# Altium PCB 0060631C.PcbDoc (part 5 of 7)
Units mil, origin at the board's own origin, x right, y up, seen from the top; angles counter-clockwise.
Board outline 5480 x 8249 mil, 6 copper layers (Top Layer, Mid-Layer 1, Mid-Layer 2, Internal Plane 1, Internal Plane 2, Bottom Layer); 514 components, 269 nets, 1375 pads, 1334 vias.
Unrouted connection lines stored in the file: 126.
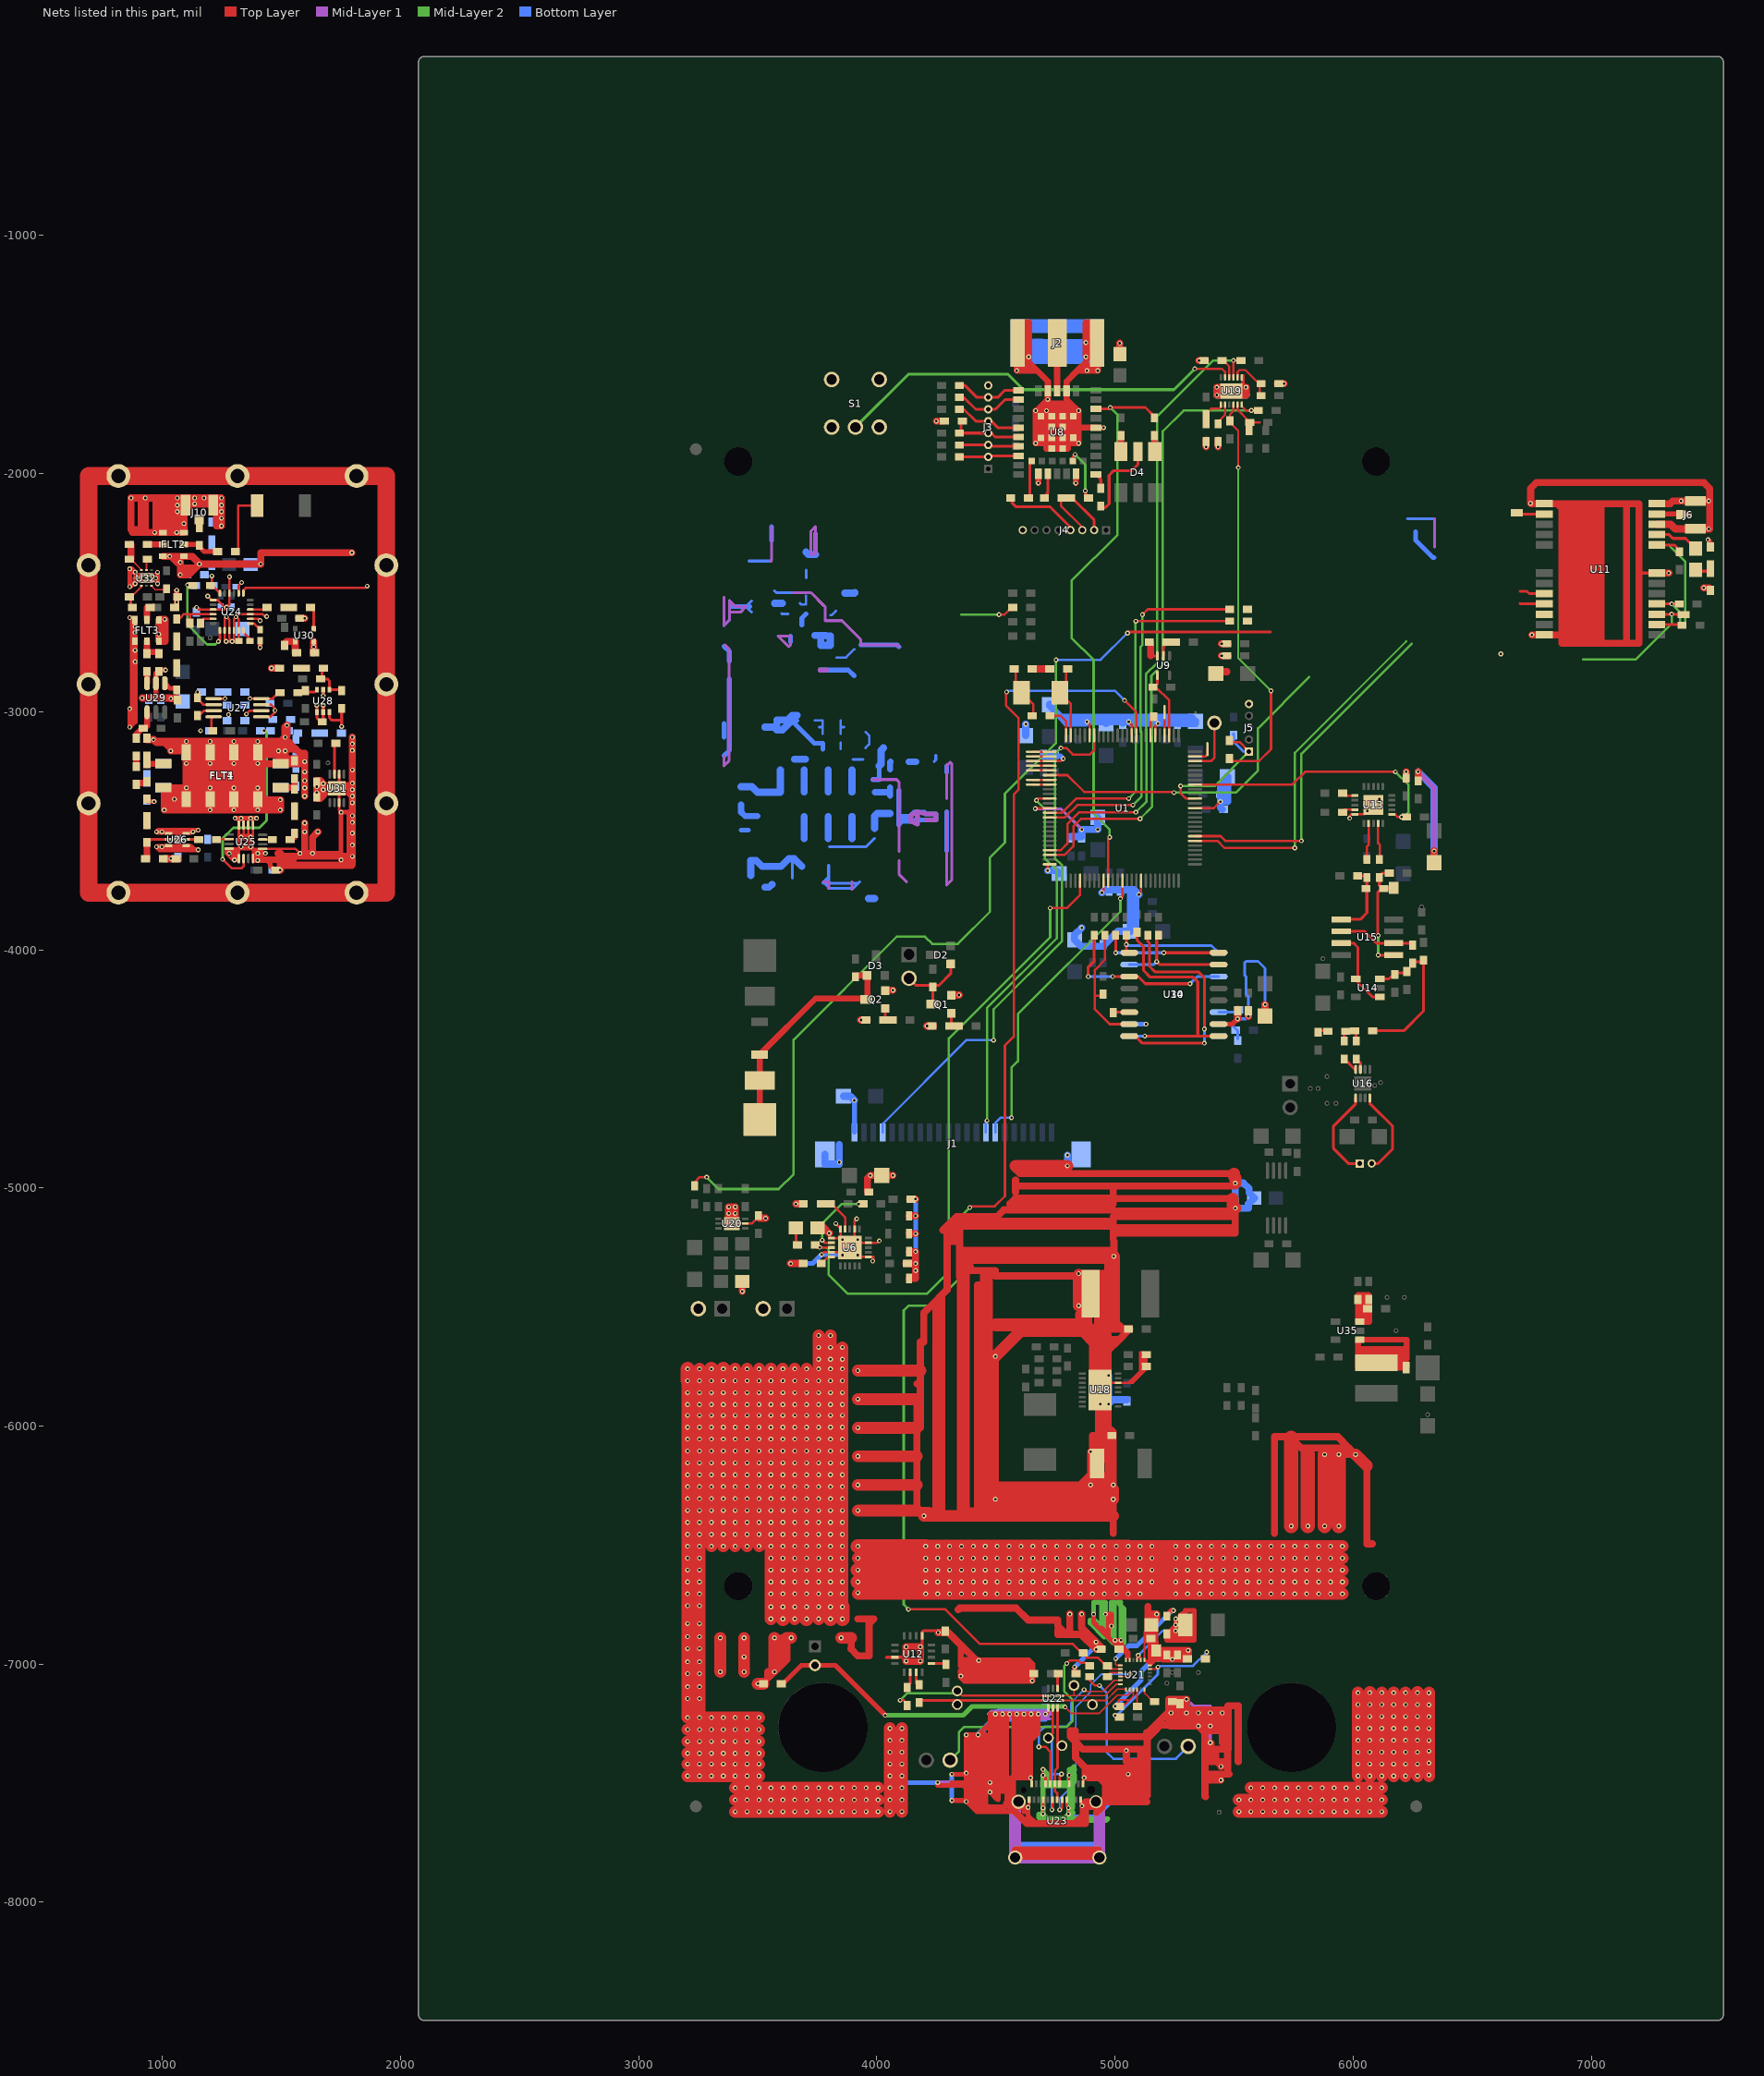
[diagram p9: the nets of this part, all layers, seen from the top]

## Via types
v1: diameter 20, hole 10, Top Layer to Bottom Layer, 1334 vias

## Nets (pads, with @x,y where several pads share a name; then routed paths per layer and width w, separated by ;. In a path a pad name is that pad's centre, name@x,y a point inside that pad or via, vN(x,y) a via of type N, cw(c..) or ccw(c..) an arc to the next point about the centre after c; other vN are vias at no path point) (continued)
GND: (continued)
  Bottom Layer w30: 3430,-3315 3475.5,-3315 3499,-3338.5 3594,-3338.5 3595,-3337.5 3595,-3245 ; 3470,-3687.5 3470,-3625 3487.5,-3625 3492.5,-3625 3517.5,-3650 3597.5,-3650 3630,-3617.5 3640,-3617.5 3645,-3617.5 3652.5,-3617.5 3685,-3650 ; 3530,-3065 3567.5,-3065 3580,-3077.5 ; 3570,-2545 3591.5,-2545 3602.5,-2545 ; 3655,-3200 3689,-3200 3700,-3200 ; 3695,-3532.5 3695,-3440 ; 3695,-3337.5 3695,-3245 ; 3702.5,-2330 3712.5,-2340 3737.5,-2340 3742.5,-2340 ; 3740,-2680 3762.5,-2680 3764,-2681.5 ; J1.23@3782.1,-4859.5 3782.1,-4900 3842.5,-4900 v1(3842.5,-4892.5) 3842.5,-4817.5 ; 3795,-3532.5 3795,-3440 ; 3795,-3337.5 3795,-3245 ; C31.2@3860,-4615 3887.5,-4615 v1(3905,-4632.5) v1@3906.1,-4633.6 ; 3865,-2502.5 3905,-2502.5 3907.5,-2500 ; 3895,-3532.5 3895,-3440 ; 3895,-3337.5 3895,-3245 ; 3965,-3785 3985,-3785 3990,-3785 ; 3990,-3490 3990,-3439.5 4002,-3427.5 4055,-3427.5 ; 4010,-3227.5 4017.5,-3220 4017.5,-3162.5 4027.5,-3152.5 ; C20.2@4625,-3100 v1(4625,-3052.5) ; C26.2@4700,-3185 C7.2@4750,-3185 ; v1(4717.5,-3667.5) 4752.5,-3667.5 C19.2@4765,-3680 ; C18.2@4725,-2970 4725,-2975 4773.8,-3023.8 ; v1(4800,-4907.5) v1(4800,-4862.5) ; C1.2@4815,-3525 4860,-3525 v1(4860,-3495) 4925,-3495 v1@4927.5,-3492.5 ; v1(4860,-3907.5) 4830,-3937.5 C124.2@4830,-3957.5 4857.5,-3985 4950,-3985 5012.5,-3922.5 C23.2@5065,-3922.5 ; v1(4927.5,-3495) v1@4927.5,-3492.5 ; C24.2@4927.5,-3445 v1@4927.5,-3492.5 ; v1(4937.4,-5907.5) v1(4972.4,-5907.5) ; v1(4945,-3760) 4957.5,-3747.5 5022.5,-3747.5 5065,-3747.5 ; C22.2@4962.5,-3050 C22.2@4962.5,-3042.5 ; v1(4972.4,-5787.5) v1(4972.4,-5907.5) ; C13.2@5032.5,-3047.5 C13.2@5032.5,-3042.5 ; R68.2@5049.9,-5890 4989.9,-5890 v1(4972.4,-5907.5) ; v1(5055,-7462.5) D7.2@5097.5,-7462.5 ; C17.2@5337.5,-3040 C17.2@5321.3,-3023.8 ; v1(5427.5,-1670) 5550,-1670 ; C16.2@5450,-3410 5442.5,-3402.5 v1(5442.5,-3377.5) ; C15.2@5450,-3347.5 5472.5,-3347.5 ; C21.2@5472.5,-3272.5 C21.2@5472.5,-3285 ; v1(6272.5,-3252.5) 6340,-3320 v1(6340,-3585) ; 3580,-3077.5 3580,-3035 3625,-3035 3645,-3015 3665,-3015 3642.5,-3037.5 3602.5,-3077.5 3580,-3077.5 ; 3764,-2681.5 3764,-2721.5 3799,-2721.5 3804,-2721.5 3804,-2681.5 3786.5,-2681.5 3785,-2680 3780,-2680 3765.5,-2680 3764,-2681.5 ; 4660,-1525 4660,-1505 J2.5@4925,-1505 ; 4660,-1525 4590,-1525 J2.4@4590,-1452.5 4590,-1367.5 4660,-1367.5 ; 4660,-1525 4925,-1525 J2.5@4925,-1505 ; 4660,-1367.5 4925,-1367.5 J2.5@4925,-1395 ; 4660,-1367.5 4660,-1395 J2.5@4925,-1395 ; 4773.8,-3023.8 C27.2@4845,-3023.8 ; 4773.8,-3023.8 4797.5,-3047.5 C27.2@4845,-3047.5 ; C27.2@4845,-3047.5 4877.5,-3047.5 v1(4882.5,-3042.5) C22.2@4962.5,-3042.5 ; C27.2@4845,-3047.5 C27.2@4845,-3041.5 C27.2@4845,-3023.8 ; C27.2@4845,-3023.8 5030,-3023.8 ; J2.5@4925,-1505 J2.5@4925,-1477.5 ; J2.5@4925,-1477.5 4660,-1477.5 4660,-1447.5 4692.5,-1447.5 4692.5,-1450 v1(4877.5,-1450) J2.5@4925,-1450 ; J2.5@4925,-1477.5 J2.5@4925,-1452.5 J2.5@4925,-1450 ; J2.5@4925,-1450 J2.5@4925,-1395 ; C22.2@4962.5,-3042.5 C13.2@5032.5,-3042.5 ; 5030,-3023.8 5032.5,-3023.8 ; 5030,-3023.8 5032.5,-3026.3 ; C13.2@5032.5,-3042.5 v1(5057.5,-3042.5) 5060,-3042.5 5065,-3047.5 C14.2@5087.5,-3047.5 ; C13.2@5032.5,-3042.5 5032.5,-3026.3 ; 5032.5,-3026.3 5032.5,-3023.8 ; 5032.5,-3023.8 C14.2@5087.5,-3023.8 ; C23.2@5065,-3922.5 5065,-3747.5 ; C23.2@5065,-3922.5 5087.5,-3900 5087.5,-3780 v1(5100,-3767.5) 5080,-3747.5 5065,-3747.5 ; C14.2@5087.5,-3047.5 5175,-3047.5 5180,-3042.5 5185,-3047.5 5262.5,-3047.5 5265,-3050 5337.5,-3050 C17.2@5321.3,-3033.8 ; C14.2@5087.5,-3047.5 C14.2@5087.5,-3041.5 C14.2@5087.5,-3026.3 ; C14.2@5087.5,-3026.3 C14.2@5090,-3023.8 ; C14.2@5087.5,-3026.3 C14.2@5087.5,-3023.8 ; C14.2@5087.5,-3023.8 C14.2@5090,-3023.8 ; C14.2@5090,-3023.8 C17.2@5311.3,-3023.8 ; C17.2@5311.3,-3023.8 C17.2@5321.3,-3033.8 ; C17.2@5311.3,-3023.8 C17.2@5321.3,-3023.8 ; C17.2@5321.3,-3033.8 C17.2@5321.3,-3023.8 ; v1(5442.5,-3377.5) 5472.5,-3347.5 ; v1(5442.5,-3377.5) 5442.5,-3315 C21.2@5472.5,-3285 ; v1(5442.5,-3377.5) 5472.5,-3377.5 5472.5,-3347.5 ; 5472.5,-3347.5 C21.2@5472.5,-3285 ; v1(5505,-5085) v1(5505,-4980) 5540,-4980 5562.5,-5002.5 5562.5,-5020 R58.2@5585,-5042.5 5560,-5067.5 5560,-5085 v1(5505,-5085)
  Bottom Layer w50: U23.S1@4594.9,-7578.2 4580.7,-7592.4 4580.7,-7770 ; 4580.7,-7770 4581.4,-7770.7 4934.3,-7770.7 U23.S3@4934.3,-7812.5 U23.S4@4580.7,-7812.5 4580.7,-7770
  other v1: 3920,-6700 1160,-3080 6620,-2757.5
GPS_OFF_1: R43.2 U1.6 U11.4 | length 1690
  Top Layer w10: U1.6@5335.6,-3542.5 5430,-3542.5 5460,-3572.5 v1(5755,-3572.5)
  Top Layer w12: U11.4@7275,-2547.6 7337.4,-2547.6 v1(7337.5,-2547.5) R43.2@7375,-2547.5
  Mid-Layer 2 w10: v1(5755,-3572.5) 5755,-3172.5 6222.5,-2705 ; v1(7337.5,-2547.5) 7372.5,-2582.5 7372.5,-2630
GPS_RST_1: R42.1 U1.7 U11.8 | length 1948
  Top Layer w10: U1.7@5335.6,-3522.8 5442.8,-3522.8 5462.5,-3542.5 v1(5782.5,-3542.5)
  Top Layer w12: U11.8@7275,-2299.7 7324.7,-2299.7 7347.2,-2299.7 R42.1@7370,-2322.5
  Mid-Layer 2 w10: v1(5782.5,-3542.5) 5782.5,-3177.5 6245,-2715 ; 7324.7,-2299.7 7395,-2370 7395,-2640
GPS_RX_1: R46.1 U1.64 | length 1503.5
  Top Layer w10: U1.64@4725.6,-3424.3 4777.5,-3424.3 4836.8,-3365 v1(5057.5,-3365) ; v1(5087.5,-2620) R46.1@5475,-2620
  Mid-Layer 2 w10: v1(5057.5,-3365) 5087.5,-3335 5087.5,-3092.5 5085,-3090 5085,-2622.5 v1(5087.5,-2620)
GPS_TX_1: R45.1 U1.65 | length 1558.7
  Top Layer w10: U1.65@4725.6,-3444 4790,-3444 4841.5,-3392.5 v1(5075,-3392.5) ; v1(5115,-2592.5) 5137.5,-2570 R45.1@5475,-2570
  Mid-Layer 2 w10: v1(5075,-3392.5) 5110,-3357.5 5110,-3085 5107.5,-3082.5 5107.5,-2727.5 5115,-2720 v1(5115,-2592.5)
GPSBACKUP_1: R92.2 U11.22 | length 4249.2
  Top Layer w10: R92.2@3235,-4997.5 3235,-4975 3255,-4955 v1(3285,-4955)
  Top Layer w12: v1(5052.5,-2670) 5056.6,-2665.9 5652.8,-2665.9
  Mid-Layer 2 w10: v1(3285,-4955) 3335,-5005 3587.5,-5005 3650,-4942.5 3650,-4377.5 4082.5,-3945 ; 4084.24,-3945 4202.5,-3945 4232.5,-3975 4340,-3975 4475,-3840 4475,-3612.5 4537.5,-3550 4537.5,-3345 4752.5,-3130 v1(4752.5,-2782.5)
  Bottom Layer w10: v1(4752.5,-2782.5) 4940,-2782.5 v1(5052.5,-2670)
INOKB_1: R88.2 R89.2 U1.35 U21.2 | length 5875.9
  Top Layer w7: R89.2@4962.5,-7007.5 4976,-7021 U21.2@5022.5,-7021
  Top Layer w10: v1(4132.5,-6770) 4287.5,-6770 4432.6,-6915.1 4822.6,-6915.1 4860,-6952.5 4880.1,-6972.6 4927.6,-6972.6 R89.2@4962.5,-7007.5 ; v1(4390,-5082.5) 4395,-5077.5 4495,-5077.5 4537.5,-5035 4537.5,-4402.5 4575,-4365 4575,-3347.5 4595,-3327.5 4595,-3027.5 4542.5,-2975 4542.5,-2920 v1(4545,-2917.5) ; v1(5040,-2952.5) 5089.7,-3002.2 U1.35@5089.7,-3099.6
  Mid-Layer 2 w10: v1(4132.5,-6770) 4112.5,-6750 4112.5,-5515 4132.5,-5495 4232.5,-5495 4347.5,-5380 4347.5,-5125 v1(4390,-5082.5)
  Bottom Layer w10: v1(4545,-2917.5) 4550,-2912.5 5000,-2912.5 v1(5040,-2952.5)
INT_1: R75.2 U1.73 U19.12 | length 2692.9
  Top Layer w9: U19.12@5532.5,-1710 5532.5,-1717.5 5550,-1735 v1(5572.5,-1735) ; v1(5572.5,-1735) 5607.5,-1735 v1(5572.5,-1735)
  Top Layer w10: U1.73@4725.6,-3601.6 4788.4,-3601.6 4825,-3565 4825,-3482.5 4857.5,-3450 v1(5105,-3450)
  Mid-Layer 2 w10: v1(5105,-3450) 5155,-3400 5155,-3067.5 5152.5,-3065 5152.5,-2850 5200,-2802.5 5200,-1822.5 5287.5,-1735 v1(5572.5,-1735)
INTA_1: R31.2 U1.18 U13.11 | length 1167.5
  Top Layer w10: U1.18@5335.6,-3306.1 5745,-3306.1 5798.6,-3252.5 v1(6177.5,-3252.5) ; U13.11@6162.3,-3431.3 6176.3,-3431.3 6187.5,-3442.5 v1(6202.5,-3442.5) R31.2@6230,-3442.5
  Mid-Layer 2 w10: v1(6177.5,-3252.5) 6232.5,-3307.5 6232.5,-3422.5 6212.5,-3442.5 v1(6202.5,-3442.5)
IRQT_1: R23.2 U1.79 U6.3 | length 2714
  Top Layer w10: R23.2@3735,-5240 3745,-5250 v1(3760,-5250) 3760.4,-5250.4 U6.3@3809,-5250.4 ; v1(4727.5,-3825) 4797.5,-3825 4853.3,-3769.2 U1.79@4853.3,-3709.6
  Mid-Layer 2 w10: v1@3760.4,-5250.4 v1(3760,-5250) 3787.5,-5250 3797.5,-5260 3797.5,-5365 3877.5,-5445 4210,-5445 4302.5,-5352.5 4302.5,-4372.5 4727.5,-3947.5 v1(4727.5,-3825)
KILL_1: R74.1 U1.72 U19.3 | length 2776.8
  Top Layer w9: U19.3@5497.1,-1596 5497.1,-1525.4 5522.1,-1525.4 R74.1@5522.5,-1525
  Top Layer w10: U1.72@4725.6,-3581.9 4772.5,-3581.9 4800,-3554.4 4800,-3472.5 4850,-3422.5 v1(5087.5,-3422.5)
  Mid-Layer 2 w9: v1@5497.1,-1525.4 v1(5497.5,-1525) ; v1(5497.5,-1525) 5412.5,-1525 v1(5497.5,-1525)
  Mid-Layer 2 w10: v1(5087.5,-3422.5) 5132.5,-3377.5 5132.5,-3075 5130,-3072.5 5130,-2842.5 5177.5,-2795 5177.5,-1760 5412.5,-1525
LCD_A0_1: J1.19 U1.44 | length 2238.1
  Top Layer w10: v1(4772.5,-3152.5) 4795,-3152.5 4822.5,-3180 4894.9,-3180 4912.4,-3162.5 U1.44@4912.4,-3099.6
  Mid-Layer 2 w10: v1(4490,-4380) 4490,-4250 4777.5,-3962.5 4777.5,-3645 4747.5,-3615 4747.5,-3177.5 v1(4772.5,-3152.5)
  Bottom Layer w10: J1.19@4024.3,-4767 4024.3,-4730.7 4375,-4380 v1(4490,-4380)
LCD_CS_1: J1.8 U1.61 | length 1611.5
  Top Layer w10: v1(4670,-3372.5) 4677.3,-3365.2 U1.61@4725.6,-3365.2
  Mid-Layer 2 w10: v1(4462.5,-4717.5) 4462.5,-4245 4755,-3952.5 4755,-3665 4705,-3615 4705,-3407.5 v1(4670,-3372.5)
  Bottom Layer w10: J1.8@4457.7,-4767 4457.7,-4722.3 v1(4462.5,-4717.5)
LCD_RST_1: J1.7 U1.88 | length 1304.7
  Top Layer w10: v1(5022.5,-3785) 5030.6,-3776.9 U1.88@5030.6,-3709.6
  Mid-Layer 2 w10: v1(4565,-4705) 4565,-4495 4592.5,-4467.5 4592.5,-4270 5022.5,-3840 v1(5022.5,-3785)
  Bottom Layer w10: J1.7@4497.1,-4767 4497.1,-4727.9 4520,-4705 v1(4565,-4705)
LE_3: R121.1 U24.19 | length 762.2
  Top Layer w10: U24.19@1339.9,-2502.5 1339.9,-2490.1 1350,-2480 1852.5,-2480 v1(1860,-2472.5) ; v1(4512.5,-2592.5) 4535,-2592.5 R121.1@4565,-2562.5
  Mid-Layer 2 w10: 4355,-2592.5 v1(4512.5,-2592.5)
MP_RST_1: R2.1 R81.2 U19.10 | length 1722.8
  Top Layer w9: U19.10@5497.1,-1710 5497.1,-1737.9 5482.5,-1752.5 5482.5,-1785 5517.5,-1820 v1(5517.5,-1975)
  Top Layer w10: R2.1@5480,-3202.5 5485,-3207.5 5605,-3207.5 5655,-3157.5 v1(5655,-2912.5)
  Mid-Layer 2 w9: v1(5517.5,-1975) 5517.5,-2775 v1(5655,-2912.5)
N00001: J6.1 L1.1 U11.11 | length 312.6
  Top Layer w20: U11.11@7275,-2169.8 J6.1@7374.8,-2169.8 ; J6.1@7377,-2172 J6.1@7374.8,-2169.8 ; v1(7412.5,-2170) 7412.3,-2169.8 J6.1@7374.8,-2169.8 ; v1(7490,-2277.5) 7500,-2287.5 L1.1@7500,-2302.5
  Bottom Layer w20: 6262.3,-2244.8 6262.5,-2245 6262.5,-2280 6335,-2352.5 6340,-2352.5
N00002: R33.2 R40.1 U10.7 | length 541
  Top Layer w10: R40.1@4950,-4192.5 4915,-4192.5 ; R33.2@4957.5,-3932.5 4957.5,-4042.5 4915,-4085 4915,-4192.5 ; U10.7@5060,-4312.5 4977.5,-4312.5 4915,-4250 4915,-4192.5
N00003: R25.2 R127.2 U6.19 | length 179
  Top Layer w10: R127.2@3760,-5067.5 3810,-5067.5 3866.7,-5124.2 U6.19@3866.7,-5173
N00007: R34.2 U10.16 U34.16 | length 512.5
  Top Layer w12: v1(5002.5,-4012.5) R34.2@5002.5,-3932.5 ; v1(5205,-4012.5) U10.16@5435,-4012.5
  Bottom Layer w12: v1(5002.5,-4012.5) U34.16@5060,-4012.5 v1(5205,-4012.5)
N00009: R35.2 U10.15 U34.15 | length 506
  Top Layer w12: R35.2@5182.5,-3932.5 5175,-3940 v1(5175,-4050) 5187.5,-4062.5 U10.15@5435,-4062.5
  Bottom Layer w12: U34.15@5060,-4062.5 5162.5,-4062.5 v1(5175,-4050)
N00010: TP11.1 U10.6 | length 69.6
  Top Layer w12: TP11.1@4992.5,-4257.5 4997.5,-4262.5 U10.6@5060,-4262.5
N00011: C39.1 L1.2 R41.2 | length 97.1
  Top Layer w12: R41.2@7437.5,-2405 7442.5,-2410 7500,-2410 L1.2@7500,-2377.5
N00013: R36.2 U10.8 U34.8 | length 1052.7
  Top Layer w12: U10.8@5060,-4362.5 5085,-4362.5 5115,-4392.5 v1(5375,-4392.5) ; R36.2@5137.5,-3932.5 5137.5,-3965 5145,-3972.5 5145,-4070 5167.5,-4092.5 5350,-4092.5 5375,-4117.5 v1(5375,-4332.5)
  Bottom Layer w12: v1(5375,-4392.5) 5375,-4362.5 ; v1(5375,-4332.5) 5375,-4362.5 ; U34.8@5435,-4362.5 5375,-4362.5
N00018: R1.2 U6.2 | length 325.1
  Top Layer w10: v1(3770,-5220) 3780.7,-5230.7 U6.2@3809,-5230.7 ; v1(3922.5,-5067.5) R1.2@3947.5,-5067.5
  Mid-Layer 2 w10: v1(3770,-5220) 3770,-5150 3852.5,-5067.5 v1(3922.5,-5067.5)
N00020: R37.2 U10.9 U34.9 | length 1016.1
  Top Layer w12: R37.2@5092.5,-3932.5 5092.5,-3960 5120,-3987.5 5120,-4087.5 5147.5,-4115 5327.5,-4115 5347.5,-4135 5347.5,-4362.5 ; v1(5125,-4362.5) 5347.5,-4362.5 ; U10.9@5435,-4362.5 5347.5,-4362.5
  Bottom Layer w12: U34.9@5060,-4362.5 v1(5125,-4362.5)
N00021: TP13.1 U11.14 | length 117.3
  Top Layer w12: TP13.1@6687.5,-2165 6692.3,-2169.8 U11.14@6802.8,-2169.8
N00023: R38.2 U10.1 U34.1 | length 487.2
  Top Layer w12: R38.2@5047.5,-3932.5 v1(5047.5,-3977.5) 5047.5,-4000 U10.1@5060,-4012.5
  Bottom Layer w12: v1(5047.5,-3977.5) 5052.5,-3982.5 5405,-3982.5 U34.1@5435,-4012.5
N00024: R41.1 U11.9 | length 186.8
  Top Layer w12: U11.9@7275,-2256.4 7326.4,-2256.4 7342.5,-2272.5 7395,-2272.5 R41.1@7437.5,-2315
N00025: D1.1 R23.1 | length 72.5
  Top Layer w12: R23.1@3660,-5240 D1.1@3660,-5167.5
N00027: R39.2 U10.3 U34.3 | length 762.7
  Top Layer w12: v1(4887.5,-4112.5) 4887.5,-4072.5 4912.5,-4047.5 R39.2@4912.5,-3932.5 ; v1(4990,-4112.5) U10.3@5060,-4112.5 5097.5,-4112.5 5127.5,-4142.5 v1(5315,-4142.5)
  Bottom Layer w12: v1(4887.5,-4112.5) v1(4990,-4112.5) ; v1(5315,-4142.5) 5345,-4112.5 U34.3@5435,-4112.5
N00028: R24.2 U6.5 | length 60.5
  Top Layer w10: R24.2@3760,-5317.5 3767.5,-5317.5 3795.2,-5289.8 U6.5@3809,-5289.8
N00031: R124.1 R125.2 U34.7 | length 126.4
  Bottom Layer w12: U34.7@5435,-4312.5 5487.5,-4312.5 5512.5,-4337.5 5515,-4340 R124.1@5515,-4375
N00036: R45.2 U11.20 | length 106.7
  Top Layer w12: 6700,-2495 6730,-2495 6739.3,-2504.3 U11.20@6802.8,-2504.3
N00038: R46.2 U11.21 | length 103.9
  Top Layer w12: 6700,-2545 6702.6,-2547.6 U11.21@6802.8,-2547.6
N00040: TP16.1 U34.6 | length 94.1
  Bottom Layer w12: U34.6@5435,-4262.5 5515,-4262.5 TP16.1@5525,-4252.5
N00041: TP12.1 U1.56 U11.3 | length 2015
  Top Layer w10: U1.56@4725.6,-3266.7 4800,-3266.7 4870.8,-3337.5 5245,-3337.5 v1(5247.5,-3340)
  Top Layer w12: U11.3@7275,-2590.9 v1@7336.6,-2590.9 ; v1(7337.5,-2590) v1@7336.6,-2590.9 ; TP12.1@7387.5,-2592.5 7385.9,-2590.9 v1@7336.6,-2590.9
  Mid-Layer 2 w10: v1(5247.5,-3340) 5507.5,-3340 5600,-3247.5 5600,-3070 5815,-2855 ; 6965,-2780 7187.5,-2780 7337.5,-2630 v1(7337.5,-2590) v1@7336.6,-2590.9
N00042: R44.1 U11.2 | length 101.4
  Top Layer w12: U11.2@7275,-2634.2 7371.7,-2634.2 R44.1@7375,-2637.5
N00043: BZ3.2 D2.1 Q1.3 R8.2 | length 316.7
  Top Layer w12: BZ3.2@4135,-4120 4165,-4150 R8.2@4235,-4150 ; Q1.3@4237.5,-4227.5 4235,-4225 R8.2@4235,-4150 ; D2.1@4310,-4070 4310,-4100 4260,-4150 R8.2@4235,-4150
N00045: Q1.1 R6.2 R7.1 | length 77.5
  Top Layer w12: Q1.1@4312.5,-4277.5 4312.5,-4320 R6.2@4347.5,-4320
N00047: D4.1 R12.2 | length 72.5
  Top Layer w26: D4.1@5025,-1907.5 R12.2@5025,-1835
N00048: R13.1 U8.1 | length 72
  Top Layer w12: U8.1@4919.5,-2004 4940,-2024.5 R13.1@4940,-2067.5
N00049: D4.3 R13.2 | length 355.3
  Top Layer w12: R13.2@4940,-2142.5 4960,-2142.5 4975,-2127.5 4975,-2007.5 4995,-1987.5 5070,-1987.5 5096,-1961.5 D4.3@5096,-1907.5
N00051: R14.1 U1.85 U8.8 | length 2411.5
  Top Layer w10: U1.85@4971.5,-3709.6 4971.5,-3533.5 v1(4977.5,-3527.5)
  Top Layer w12: U8.8@4919.5,-1728.5 4974,-1728.5 v1(4980,-1722.5) 5127.5,-1722.5 R14.1@5165,-1760
  Mid-Layer 2 w10: v1(4977.5,-3527.5) 4977.5,-3495 4910,-3427.5 4910,-2782.5 4817.5,-2690 4817.5,-2450 5010,-2257.5 5010,-1752.5 v1(4980,-1722.5)
N00052: D4.5 R14.2 | length 73.3
  Top Layer w26: R14.2@5165,-1835 5165,-1905.5 D4.5@5167,-1907.5
N00059: R9.1 U8.32 | length 239.3
  Top Layer w12: U8.32@4823,-1947 4823,-1929.5 v1(4832.5,-1920) ; v1(4875,-2072.5) 4875,-2082.5 R9.1@4895,-2102.5
  Mid-Layer 2 w12: v1(4832.5,-1920) 4875,-1962.5 v1(4875,-2072.5)
N00060: J4.2 R9.2 | length 173.3
  Top Layer w12: R9.2@4820,-2102.5 4912.5,-2195 J4.2@4912.5,-2237.5
N00061: R10.1 U8.27 | length 109.7
  Top Layer w12: R10.1@4697.5,-2102.5 4717.6,-2082.4 U8.27@4717.6,-2001.1
N00062: J4.3 R10.2 | length 172.3
  Top Layer w10: R10.2@4772.5,-2102.5 4772.5,-2135 4862.5,-2225 J4.3@4862.5,-2237.5
N00063: R11.1 U8.36 | length 158.5
  Top Layer w12: R11.1@4642.5,-2102.5 4642.5,-1954.3 U8.36@4649.8,-1947
N00064: J4.4 R11.2 | length 320
  Top Layer w12: R11.2@4567.5,-2102.5 4567.5,-2122.5 4585,-2140 4727.5,-2140 4812.5,-2225 J4.4@4812.5,-2237.5
N00067: BZ1.2 BZ2.2 BZ4.2 D3.1 Q2.3 R3.2 | length 968.9
  Top Layer w25: BZ4.2@3507.5,-4713 BZ1.2@3507.5,-4549.4 BZ2.2@3507.5,-4440.3 3742.8,-4205 Q2.3@3957.5,-4205 ; R3.2@3910,-4107.5 3947.5,-4107.5 3960,-4120 Q2.3@3960,-4205 ; Q2.3@3957.5,-4205 Q2.3@3960,-4205 ; Q2.3@3957.5,-4205 3960,-4207.5 Q2.3@3960,-4205
N00068: J3.2 R15.1 U8.23 | length 246.7
  Top Layer w12: R15.1@4352.5,-1930 J3.2@4467.5,-1930 4467.5,-1925.3 U8.23@4594.5,-1925.3
N00072: J3.3 R18.1 U8.22 | length 244.4
  Top Layer w12: R18.1@4352.5,-1880 J3.3@4467.5,-1880 4473.4,-1885.9 U8.22@4594.5,-1885.9
N00076: J3.4 R19.1 R27.1 U8.21 | length 298.9
  Top Layer w12: R27.1@4352.5,-1780 4352.5,-1830 J3.4@4467.5,-1830 4480,-1830 4496.6,-1846.6 U8.21@4594.5,-1846.6
N00080: Q2.1 R4.1 R5.2 | length 72.5
  Top Layer w12: Q2.1@4035,-4257.5 4035,-4295 R5.2@4070,-4295
N00081: J3.5 R28.1 U8.20 | length 274
  Top Layer w12: R28.1@4352.5,-1730 4365,-1730 4415,-1780 J3.5@4467.5,-1780 4480,-1780 4507.2,-1807.2 U8.20@4594.5,-1807.2
N00085: J3.6 R16.1 U8.17 | length 279.6
  Top Layer w12: R16.1@4352.5,-1680 4365,-1680 4415,-1730 J3.6@4467.5,-1730 4497.5,-1730 4538.3,-1689.2 U8.17@4594.5,-1689.2
N00087: J5.1 R2.2 R32.1 U1.15 | length 661.7
  Top Layer w10: v1(5275,-3312.5) 5275,-3342.5 5297.7,-3365.2 U1.15@5335.6,-3365.2 ; R2.2@5480,-3127.5 5522.5,-3127.5 J5.1@5562.5,-3167.5
  Mid-Layer 2 w10: v1(5275,-3312.5) 5417.5,-3312.5 J5.1@5562.5,-3167.5
  Bottom Layer w12: R32.1@5497.5,-3092.5 5497.5,-3125 5540,-3167.5 J5.1@5562.5,-3167.5
N00088: J3.7 R17.1 U8.16 | length 275.2
  Top Layer w12: R17.1@4352.5,-1630 4370,-1630 4420,-1680 J3.7@4467.5,-1680 4507.5,-1680 4537.7,-1649.8 U8.16@4594.5,-1649.8
N00091: TP8.1 U1.58 | length 70.1
  Top Layer w10: TP8.1@4655.5,-3306.1 U1.58@4725.6,-3306.1
N00092: TP7.1 U1.57 | length 70.1
  Top Layer w10: TP7.1@4655.5,-3286.4 U1.57@4725.6,-3286.4
N00093: TP1.1 U1.55 | length 70.1
  Top Layer w10: TP1.1@4655.5,-3247 U1.55@4725.6,-3247
N00094: TP2.1 U1.54 | length 70.1
  Top Layer w10: TP2.1@4655.5,-3227.3 U1.54@4725.6,-3227.3
N00095: TP9.1 U1.23 | length 233.2
  Top Layer w10: U1.23@5335.6,-3207.6 5402.4,-3207.6 5417.5,-3192.5 TP9.1@5417.5,-3047.5
N00096: J2.1 U8.13 | length 200.3
  Top Layer w26: U8.13@4757,-1652.6 4757,-1453 J2.1@4757.5,-1452.5
N00097: TP4.1 U1.24 | length 77.7
  Top Layer w10: U1.24@5335.6,-3187.9 5379.6,-3187.9 5387.5,-3180 TP4.1@5387.5,-3157.5
N00098: TP3.1 U1.52 | length 70.1
  Top Layer w10: TP3.1@4655.5,-3187.9 U1.52@4725.6,-3187.9
N00099: TP6.1 U1.51 | length 70.1
  Top Layer w10: TP6.1@4655.5,-3168.2 U1.51@4725.6,-3168.2
N00103: R22.2 U1.28 U9.4 | length 287.5
  Top Layer w10: R22.2@5165,-2897.5 R22.2@5172.5,-2897.5 ; R22.2@5168.8,-2893.7 R22.2@5172.5,-2897.5 ; U1.28@5227.6,-3099.6 5227.6,-2952.6 R22.2@5172.5,-2897.5
  Top Layer w12: R22.2@5168.8,-2893.7 5177.5,-2885 U9.4@5177.5,-2847.5
N00104: TP10.1 U1.29 | length 97.5
  Top Layer w10: U1.29@5207.9,-3099.6 TP10.1@5207.9,-3002.1
N00105: R123.2 U1.32 | length 90.3
  Top Layer w10: U1.32@5148.8,-3099.6 5148.8,-3028.7 R123.2@5162.5,-3015
N00106: C12.1 U1.49 Y1.2 | length 310.2
  Top Layer w10: C12.1@4795,-2820 4795,-2892.5 Y1.2@4767.5,-2920 4813.9,-2966.4 U1.49@4813.9,-3099.6
N00107: R26.1 U1.50 | length 131.1
  Top Layer w10: R26.1@4732.5,-3017.5 4772.5,-3017.5 4794.2,-3039.2 U1.50@4794.2,-3099.6
N00108: C11.1 R26.2 Y1.1 | length 228.6
  Top Layer w10: C11.1@4582.5,-2820 4582.5,-2895 Y1.1@4607.5,-2920 4657.5,-2970 R26.2@4657.5,-3017.5
N00109: R20.1 R21.2 U9.2 | length 103.9
  Top Layer w12: U9.2@5203.1,-2765.5 5203.1,-2729.4 R20.1@5223.7,-2708.8 ; R20.1@5225,-2707.5 R20.1@5223.7,-2708.8 ; R21.2@5260,-2707.5 5258.7,-2708.8 R20.1@5223.7,-2708.8
N00110: R108.2 U24.20 | length 80.1
  Top Layer w10: U24.20@1320.2,-2502.5 1320.2,-2469.8 v1(1332.5,-2457.5)
  Bottom Layer w10: 3804.7,-2595 3810,-2595 3827.5,-2577.5
N00111: C90.2 U24.14 | length 133.8
  Top Layer w10: U24.14@1368.8,-2610.1 1402.6,-2610.1 v1(1410,-2617.5)
  Bottom Layer w10: 3830,-2772.5 3870,-2772.5 3905,-2737.5
N00113: R101.2 R107.1 U30.1 | length 96.6
  Top Layer w30: R101.2@1512.5,-2715 1522.5,-2705 U30.1@1557.5,-2705 R107.1@1557.5,-2752.5
N00114: C100.1 R112.2 U24.7 | length 442.9
  Top Layer w10: v1(1235,-2705) 1241.4,-2698.6 U24.7@1241.4,-2658.7
  Top Layer w12: v1(1105,-2467.5) 1107.5,-2470 R112.2@1132.5,-2470
  Mid-Layer 2 w10: v1(1105,-2467.5) 1105,-2635 1187.5,-2717.5 1222.5,-2717.5 v1(1235,-2705)
  Bottom Layer w12: 3600,-2587.5 3602.5,-2590 3627.5,-2590
N00115: R110.1 U30.3 | length 92.4
  Top Layer w12: R110.1@1627.5,-2562.5 1634.5,-2569.5 U30.3@1634.5,-2652
N00116: C89.1 R110.2 | length 32.5
  Top Layer w12: C89.1@1520,-2562.5 R110.2@1552.5,-2562.5
N00117: C89.2 U24.16 | length 79.6
  Top Layer w10: U24.16@1368.8,-2570.7 1436.8,-2570.7 C89.2@1445,-2562.5
N00118: C98.1 C99.1 R112.1 U24.24 | length 151.9
  Top Layer w10: v1(1207.5,-2430) 1207.5,-2470 1208.9,-2470 U24.24@1241.4,-2502.5
  Bottom Layer w10: 3677.5,-2545 3682.5,-2550 3702.5,-2550 3702.5,-2512.5
N00120: R114.2 U31.7 | length 130.2
  Top Layer w12: U31.7@1722.5,-3262.7 R114.2@1722.5,-3132.5
N00121: C99.2 R113.1 | length 32.5
  Bottom Layer w12: 3702.5,-2437.5 3702.5,-2405
N00123: C91.1 L9.1 U24.4 | length 190.8
  Top Layer w10: C91.1@1060,-2605 1075.8,-2605 1090.4,-2590.4 1115.4,-2590.4 ; L9.1@1115,-2622.5 1115.4,-2622.1 1115.4,-2590.4 ; U24.4@1212.5,-2590.4 1115.4,-2590.4
N00124: C121.1 U24.12 | length 55.2
  Top Layer w10: U24.12@1339.9,-2658.7 1339.9,-2667.4 1367.5,-2695 C121.1@1367.5,-2702.5
N00125: R118.1 U24.13 | length 51.6
  Top Layer w10: U24.13@1368.8,-2629.8 1384.8,-2629.8 R118.1@1410,-2655
N00126: R111.1 U24.5 | length 57.6
  Top Layer w10: R111.1@1160,-2622.5 1172.4,-2610.1 U24.5@1212.5,-2610.1
N00128: C91.2 L12.1 | length 37.5
  Top Layer w12: L12.1@1060,-2717.5 C91.2@1060,-2680
N00129: C94.1 L12.2 | length 35
  Top Layer w12: C94.1@1060,-2827.5 L12.2@1060,-2792.5
N00130: R103.2 R109.1 U25.14 | length 867.1
  Top Layer w10: v1(1252.5,-3620) 1290,-3657.5 1332.5,-3657.5 1340.4,-3649.6 U25.14@1340.4,-3616.9
  Mid-Layer 2 w12: v1(1252.5,-3620) 1252.5,-3532.5 1297.5,-3487.5 1407.5,-3487.5 1437.5,-3457.5 1437.5,-3090 v1(1427.5,-3080)
  Bottom Layer w12: 3900,-3200 3922.5,-3200 3942.5,-3200
N00131: C103.2 L15.1 R106.2 | length 87.7
  Top Layer w30: L15.1@1010,-3617.5 v1(1035,-3617.5) R106.2@1062.5,-3617.5
  Bottom Layer w30: 3530,-3737.5 3547.5,-3737.5 3560,-3725
N00132: R115.2 U32.6 | length 74
  Top Layer w7: U32.6@954.1,-2472 969.6,-2487.5 1007.5,-2487.5 R115.2@1017.5,-2477.5
N00133: C94.2 U29.1 | length 59.1
  Top Layer w20: U29.1@1010,-2880.5 1032,-2902.5 C94.2@1060,-2902.5
N00134: L17.1 U32.2 | length 49.1
  Top Layer w7: U32.2@932.5,-2405 932.5,-2370 L17.1@942.5,-2360
N00135: C109.1 L18.2 U32.4 | length 109.9
  Top Layer w7: L18.2@867.5,-2517.5 870,-2517.5 910.9,-2476.6 U32.4@910.9,-2472
  Top Layer w12: C109.1@867.5,-2562.5 L18.2@867.5,-2517.5
N00136: ANT1.1 C106.1 | length 274.6
  Top Layer w10: C106.1@1312.5,-2327.5 1317.5,-2322.5 1317.5,-2135 ANT1.1@1397.5,-2135
N00137: C93.1 C106.2 FLT2.2 | length 159.9
  Top Layer w20: FLT2.2@1090,-2297.5 1145,-2297.5 1155,-2307.5 1175,-2327.5 C106.2@1237.5,-2327.5
N00138: C107.2 L17.2 U32.3 | length 125.5
  Top Layer w7: L17.2@867.5,-2360 910.9,-2403.4 U32.3@910.9,-2405
  Top Layer w30: L17.2@867.5,-2360 C107.2@867.5,-2297.5
N00139: C87.1 L15.2 U26.5 | length 160.2
  Top Layer w12: C87.1@935,-3555 953.5,-3536.5 U26.5@1025,-3536.5
  Top Layer w26: L15.2@935,-3617.5 C87.1@935,-3555
N00140: C107.1 FLT2.5 | length 59
  Top Layer w26: C107.1@942.5,-2297.5 FLT2.5@1001.5,-2297.5
N00141: C109.2 FLT3.2 | length 60
  Top Layer w26: FLT3.2@935,-2615 935,-2562.5 C109.2@942.5,-2562.5
N00142: C80.1 FLT3.5 L4.1 | length 96.5
  Top Layer w26: FLT3.5@935,-2703.5 935,-2750 L4.1@985,-2750
N00143: C80.2 U29.3 | length 55.5
  Top Layer w25: U29.3@935,-2880.5 C80.2@935,-2825
N00144: C95.2 L5.2 U29.4 | length 139.5
  Top Layer w25: C95.2@890,-3117.5 890,-3095 915,-3070 925,-3070 935,-3060 U29.4@935,-3002.5
N00145: C95.1 L11.1 | length 32.5
  Top Layer w26: L11.1@890,-3225 C95.1@890,-3192.5
N00146: L10.1 L11.2 | length 45
  Top Layer w26: L11.2@890,-3300 L10.1@935,-3300
N00147: C79.1 FLT1.11 L10.2 | length 101.5
  Top Layer w26: L10.2@935,-3225 L10.2@935,-3219 ; C79.1@935,-3192.5 L10.2@935,-3219 ; FLT1.11@1004,-3219 L10.2@935,-3219
N00148: C78.1 FLT1.5 L13.1 | length 92.9
  Top Layer w26: FLT1.5@1496,-3319 L13.1@1554,-3319 ; C78.1@1555,-3287.5 L13.1@1555,-3319 ; L13.1@1554,-3319 1555,-3320 L13.1@1555,-3319 ; L13.1@1554,-3319 L13.1@1555,-3319
N00149: L13.2 L14.1 | length 35
  Top Layer w26: L14.1@1555,-3430 L13.2@1555,-3395
N00150: C114.1 L14.2 | length 37.7
  Top Layer w26: C114.1@1542.5,-3537.5 1555,-3525 L14.2@1555,-3505
N00151: C114.2 U25.3 | length 47.1
  Top Layer w10: U25.3@1420.6,-3536.9 1466.9,-3536.9 C114.2@1467.5,-3537.5
N00152: C77.1 U25.10 | length 48.3
  Top Layer w10: C77.1@1232.5,-3537.5 1234.4,-3535.6 U25.10@1280,-3535.6
N00153: C77.2 U26.2 | length 57.9
  Top Layer w12: U26.2@1100,-3536.5 1156.5,-3536.5 C77.2@1157.5,-3537.5
N00154: C93.2 J10.1 | length 39.7
  Top Layer w26: J10.1@1154.5,-2193 1154.5,-2232 C93.2@1155,-2232.5
N00155: C87.2 L8.1 | length 32.5
  Top Layer w26: C87.2@935,-3480 L8.1@935,-3447.5
N00156: C86.1 R104.2 | length 35
  Top Layer w26: R104.2@1560,-2817.5 C86.1@1595,-2817.5
N00157: C86.2 L7.2 R105.1 U28.4 | length 171.7
  Top Layer w12: C86.2@1670,-2817.5 1670,-2862.5 1692.5,-2862.5 1701,-2871 U28.4@1701,-2907.5 1742.5,-2907.5 L7.2@1752.5,-2917.5
N00158: C83.1 R117.2 U27.5 U27.7 | length 224.9
  Top Layer w10: U27.5@1415,-3021.8 1453.2,-3021.8 1472.5,-3002.5 v1(1472.5,-2995) 1472.5,-2987.5 1455.6,-2970.6 U27.7@1415,-2970.6
  Bottom Layer w10: 3952.5,-3152.5 3967.5,-3137.5 3967.5,-3115 3967.5,-3100 3952.5,-3085
N00159: C115.2 L7.1 U28.3 | length 180.1
  Top Layer w12: U28.3@1701,-3001.7 1701,-3026 1710,-3035 1752.5,-3035 ; v1(1752.5,-3062.5) 1752.5,-3035 ; L7.1@1752.5,-2992.5 1752.5,-3035
  Bottom Layer w12: 4240,-3210 4247.5,-3202.5 4247.5,-3182.5
N00160: C85.2 L16.2 U28.6 | length 91.7
  Top Layer w12: C85.2@1562.5,-2920 1565,-2917.5 1600,-2917.5 1639,-2917.5 U28.6@1649,-2907.5
N00161: L8.2 L20.1 | length 62.1
  Top Layer w20: L8.2@935,-3372.5 940,-3377.5 v1(965,-3377.5)
  Bottom Layer w20: 3430,-3497.5 3460,-3497.5
N00162: C116.1 FLT4.11 L20.2 | length 108.1
  Bottom Layer w26: 3430,-3390 3430,-3422.5 3446,-3438.5 3499,-3438.5
N00163: C117.1 FLT4.5 L19.1 | length 100.4
  Bottom Layer w26: 3991,-3338.5 4054,-3338.5 ; 4055,-3352.5 4055,-3338.5 ; 4055,-3317.5 4055,-3337.5 ; 4054,-3338.5 4055,-3338.5 ; 4054,-3338.5 4055,-3337.5 ; 4055,-3338.5 4055,-3337.5
N00164: L19.2 L21.1 | length 33.5
  Bottom Layer w26: 4055,-3242.5 4055,-3212.5 4057.5,-3210
N00165: C115.1 L21.2 | length 32.5
  Bottom Layer w26: 4132.5,-3210 4165,-3210
N00166: C85.1 L6.1 R116.1 U27.8 | length 200.4
  Top Layer w10: v1(1367.5,-2945) U27.8@1415,-2945 1462.5,-2945 C85.1@1487.5,-2920
  Bottom Layer w10: 3847.5,-3092.5 3847.5,-3065 ; 3847.5,-3037.5 3847.5,-3065 ; 3862.5,-3065 3847.5,-3065
N00167: C82.1 U27.6 | length 95.7
  Top Layer w10: v1(1352.5,-3010) 1366.3,-2996.2 U27.6@1415,-2996.2
  Bottom Layer w10: 3847.5,-3157.5 3847.5,-3130
N00168: C119.1 L6.2 R116.2 U27.1 | length 150
  Top Layer w10: U27.1@1215,-2945 v1(1262.5,-2945)
  Bottom Layer w10: 3740,-3037.5 3772.5,-3037.5 3772.5,-3065 ; 3757.5,-3065 3772.5,-3065 ; 3772.5,-3092.5 3772.5,-3065
N00169: C118.1 U27.3 | length 78.4
  Top Layer w10: C118.1@1147.5,-3022.5 1173.8,-2996.2 U27.3@1215,-2996.2
N00170: R102.1 U27.4 | length 62.3
  Top Layer w10: R102.1@1205,-3080 1205,-3031.8 U27.4@1215,-3021.8
N00171: C72.1 R100.1 U21.23 U21.24 U23.A4 U23.A9 U23.B4 U23.B9 ~FV1.FV | length 4839.4
  Top Layer w7: C72.1@5018.8,-6939 C72.1@5020,-6937.7 ; C72.1@5027.5,-6935.2 5027.5,-6937.7 C72.1@5022.5,-6937.7 ; U21.24@5045.1,-6982.6 5045.1,-6972.7 ; U21.23@5060.9,-6982.6 5060.9,-6972.7 ; C72.1@5020,-6937.7 5017.5,-6937.7 5020,-6935.2 C72.1@5025,-6930.2 ; C72.1@5020,-6937.7 5032.5,-6950.2 5035,-6950.2 5045.1,-6960.3 ; C72.1@5020,-6937.7 C72.1@5022.5,-6937.7 ; C72.1@5022.5,-6937.7 5023.8,-6939 C72.1@5028.8,-6939 ; C72.1@5025,-6930.2 5035,-6930.2 5043.8,-6939 ; C72.1@5025,-6930.2 5030,-6925.2 5032.5,-6925.2 5037.5,-6925.2 5060.9,-6948.6 5060.9,-6972.7 ; C72.1@5028.8,-6939 5036.3,-6939 ; C72.1@5028.8,-6939 5045.1,-6955.3 ; 5036.3,-6939 5043.8,-6939 ; 5036.3,-6939 5050,-6952.7 5050,-6972.7 ; 5043.8,-6939 5055,-6950.2 5055,-6972.7 ; 5045.1,-6972.7 5050,-6972.7 ; 5045.1,-6972.7 5045.1,-6955.3 ; 5045.1,-6972.7 5045.1,-6960.3 ; 5045.1,-6960.3 5045.1,-6955.3 ; 5050,-6972.7 5055,-6972.7 ; 5055,-6972.7 5060.9,-6972.7
  Top Layer w10: v1(4697.5,-7629.5) v1(4697.5,-7604.5) ; v1(4697.5,-7442) v1(4697.5,-7467) ; U23.B9@4698.4,-7569.9 v1@4698.4,-7603.6 ; U23.A4@4708.3,-7503 4708.3,-7477.8 ; U23.B4@4796.9,-7569.9 4796.9,-7596.4 ; v1(4805,-7629.5) v1(4805,-7604.5) ; U23.A9@4806.8,-7503 v1@4806.8,-7467.7 ; v1(4697.5,-7604.5) v1@4698.4,-7603.6 ; v1(4697.5,-7604.5) v1@4698.4,-7603.6 ; v1(4697.5,-7467) 4708.3,-7477.8 ; v1(4697.5,-7467) 4708.3,-7477.8 ; 4796.9,-7596.4 v1(4805,-7604.5) ; 4796.9,-7596.4 v1(4805,-7604.5) ; v1@4806.8,-7467.7 v1(4807.5,-7467) v1@4806.8,-7467.7
  Top Layer w20: v1(4910,-6790.2) 4910,-6825.2 4937.5,-6852.7 ; v1(4960,-6790.2) 4972.5,-6790.2 ; v1(4985,-6840.2) 4985,-6790.2 4972.5,-6790.2 ; C72.1@5018.8,-6939 5017.5,-6937.7 5012.5,-6932.7 C72.1@5012.5,-6927.7 ; C72.1@5022.5,-6937.7 5020,-6935.2 C72.1@5012.5,-6927.7 ; C72.1@5032.5,-6925.2 5025,-6917.7 v1(5025,-6900.2) 5012.5,-6900.2 ; 4937.5,-6852.7 4942.5,-6847.7 4960,-6865.2 4960,-6875.2 ; 4937.5,-6852.7 4960,-6875.2 ; 4960,-6875.2 4972.5,-6887.7 ; 4972.5,-6887.7 4972.5,-6790.2 ; 4972.5,-6887.7 5000,-6915.2 ; 5000,-6915.2 v1(5000,-6900.2) 5012.5,-6900.2 ; 5000,-6915.2 C72.1@5012.5,-6927.7 ; C72.1@5012.5,-6927.7 5012.5,-6900.2
  Mid-Layer 2 w12: 4712.5,-7644.5 4790,-7644.5
  Mid-Layer 2 w20: v1@4692.5,-7627 4690,-7629.5 4680,-7629.5 4680,-7644.5 4685.5,-7650 4697.2,-7650 ; v1@4698.4,-7603.6 v1(4697.5,-7604.5) ; v1@4700,-7444.5 4720,-7464.5 4720,-7489.5 ; 4790,-7644.5 v1(4805,-7629.5) v1(4805,-7604.5) ; 5025,-6740.2 5010,-6740.2 5025,-6755.2 ; 4697.2,-7650 4692.5,-7657 4963,-7657 4970,-7650 4799.5,-7650 ; 4697.2,-7650 4697.5,-7649.5 v1(4697.5,-7629.5) ; v1(4697.5,-7629.5) v1(4697.5,-7604.5) ; v1(4697.5,-7629.5) 4712.5,-7644.5 4707.5,-7649.5 4708,-7650 4799.5,-7650 ; v1(4697.5,-7629.5) v1(4697.5,-7604.5) ; v1(4697.5,-7604.5) 4697.5,-7512 ; v1(4697.5,-7604.5) 4697.5,-7512 ; 4697.5,-7512 4742.5,-7512 ; 4697.5,-7512 4697.5,-7497 ; 4697.5,-7497 4727.5,-7497 ; 4697.5,-7497 v1(4697.5,-7467) ; v1(4697.5,-7467) 4720,-7489.5 ; v1(4697.5,-7467) 4720,-7489.5 ; 4720,-7489.5 4727.5,-7497 ; 4727.5,-7497 4728.8,-7498.3 ; 4728.8,-7498.3 4742.5,-7512 ; 4728.8,-7498.3 4798.7,-7498.3 ; 4742.5,-7512 4795,-7512 4807.5,-7499.5 ; 4798.7,-7498.3 4807.5,-7499.5 ; 4798.7,-7498.3 4807.5,-7489.5 ; 4799.5,-7650 4825,-7624.5 ; v1(4805,-7604.5) 4822.5,-7604.5 4822.5,-7499.5 ; v1(4805,-7604.5) 4825,-7624.5 ; v1(4805,-7604.5) 4825,-7624.5 ; v1(4805,-7604.5) 4807.5,-7602 4807.5,-7499.5 ; v1@4806.8,-7467.7 v1(4807.5,-7467) ; v1@4806.8,-7467.7 4820,-7454.5 ; v1@4806.8,-7467.7 v1(4807.5,-7467) ; 4807.5,-7499.5 4807.5,-7489.5 ; 4807.5,-7489.5 v1(4807.5,-7467) ; 4807.5,-7489.5 v1(4807.5,-7467) ; v1(4807.5,-7467) 4807.5,-7442 ; 4807.5,-7442 4820,-7454.5 ; 4807.5,-7442 4815,-7442 4827.5,-7429.5 4827.5,-7442 ; 4820,-7454.5 4822.5,-7457 ; 4820,-7454.5 4827.5,-7447 ; 4822.5,-7499.5 4822.5,-7457 ; 4822.5,-7499.5 4830,-7492 4830,-7464.5 4822.5,-7457 ; 4827.5,-7447 4827.5,-7442 ; 4827.5,-7447 4830,-7444.5 4830,-7442 4827.5,-7442 ; 4942.6,-6740.2 4910,-6740.2 v1(4910,-6790.2) 4910,-6810.2 4941.2,-6841.4 4942.6,-6840.1 4942.6,-6740.2 ; 4942.6,-6740.2 4960,-6740.2 v1(4960,-6790.2) 4960,-6850.1 4955,-6845.1 4955,-6875 ; 4955,-6887.5 4955,-6875 ; 4955,-6887.5 4895.1,-6827.6 4895.1,-6815.1 4955,-6875 ; 4955,-6887.5 4961.3,-6881.3 4992.7,-6912.7 5037.5,-6912.7 5037.5,-6767.7 5025,-6755.2 ; 4955,-6875 4960,-6880 4960,-6860.2 4985,-6885.2 ; 4985,-6885.2 v1(4985,-6840.2) 4985,-6740.3 4985.1,-6740.2 4997.6,-6740.2 ~FV1.FV@4997.6,-6897.8 ; 4985,-6885.2 ~FV1.FV@4997.6,-6897.8 ; ~FV1.FV@4997.6,-6897.8 v1(5000,-6900.2) v1(5025,-6900.2) 5025,-6755.2
  Bottom Layer w12: v1(4805,-7629.5) 4812.5,-7637 4928.5,-7637 4977.5,-7588 R100.1@4977.5,-7570
  other v1: 4855,-6705
N00172: U21.5 U23.A5 | length 737.9
  Top Layer w7: v1(4870,-7107.5) 4877.5,-7115 4950,-7115 4996.8,-7068.2 U21.5@5022.5,-7068.2
  Top Layer w10: v1(4680,-7347.5) 4707.5,-7347.5 4728,-7368 U23.A5@4728,-7503
  Bottom Layer w7: 4815,-7242.5 4815,-7162.5 v1(4870,-7107.5)
  Bottom Layer w10: v1(4680,-7347.5) 4680,-7287.5 4705,-7262.5 4795,-7262.5 4815,-7242.5
N00173: TP23.1 U22.10 U23.A6 U23.B6 | length 444.2
  Top Layer w10: U23.B6@4757.5,-7569.9 4757.5,-7542 4747.7,-7532.2 U23.A6@4747.7,-7503 4747.7,-7446.8 4758.6,-7435.9 4758.6,-7356.4 ; U22.10@4758.6,-7184.2 4758.6,-7323.6 ; TP23.1@4777.5,-7342.5 TP23.1@4775,-7340 ; 4758.6,-7356.4 TP23.1@4775,-7340 ; 4758.6,-7356.4 4758.6,-7323.6 ; 4758.6,-7323.6 TP23.1@4775,-7340
N00174: TP22.1 U22.9 U23.A7 U23.B7 | length 569.2
  Top Layer w10: TP22.1@4720,-7310 4738.9,-7291.1 U22.9@4738.9,-7184.2 ; v1(4735,-7612) 4737.8,-7609.2 U23.B7@4737.8,-7569.9 ; U23.A7@4767.4,-7503 4767.4,-7469.6 v1(4775,-7462)
  Bottom Layer w10: TP22.1@4720,-7310 4735,-7325 4735,-7462 ; v1(4735,-7612) 4735,-7462 ; v1(4775,-7462) 4735,-7462
N00175: C68.1 U21.1 | length 405.7
  Top Layer w7: v1(5002.5,-6977.7) 5002.5,-7000.2 5007.5,-7005.2 U21.1@5022.5,-7005.2
  Top Layer w20: C68.1@5217.5,-6792.7 5235,-6775.2 v1(5245,-6775.2)
  Bottom Layer w20: v1(5002.5,-6977.7) 5057.5,-6922.7 5092.8,-6922.7 5240.3,-6775.2 v1(5245,-6775.2)
N00176: U21.4 U23.B5 | length 852.4
  Top Layer w7: U21.4@5022.5,-7052.5 5052.7,-7052.5 v1(5062.6,-7042.6)
  Top Layer w10: v1(4767.5,-7612) 4777.2,-7602.3 U23.B5@4777.2,-7569.9
  Bottom Layer w7: v1(4767.5,-7612) 4767.5,-7564.5 4835,-7497 4835,-7180 4897.5,-7117.5 4897.5,-7087.5 4942.4,-7042.6 v1(5062.6,-7042.6)
N00177: TP18.1 U21.6 U22.2 | length 320.3
  Top Layer w7: U22.2@4765.1,-7133 4765.5,-7132.6 4827.5,-7132.6 ; TP18.1@4827.5,-7090 4827.5,-7132.6 ; U21.6@5022.5,-7084 5021.4,-7085.1 5004.9,-7085.1 4957.4,-7132.6 4827.5,-7132.6
N00178: C68.2 L3.1 U21.20 U21.21 ~FV3.FV | length 1486.6
  Top Layer w7: U21.21@5092.4,-6982.6 5092.4,-6972.7 ; U21.20@5108.1,-6982.6 5108.1,-6973.3 ; 5092.4,-6972.7 5107.5,-6972.7 5108.1,-6973.3 ; 5092.4,-6972.7 5092.4,-6967.8 v1(5097.5,-6962.7) ; v1(5097.5,-6962.7) 5108.1,-6973.3 ; v1(5097.5,-6962.7) 5108.1,-6973.3
  Top Layer w20: C68.2@5217.5,-6882.5 5282.5,-6882.5 ; C68.2@5217.5,-6882.5 5217.5,-6900 5317.5,-6900 ; C68.2@5217.5,-6882.5 C68.2@5217.5,-6867.7 ; C68.2@5217.5,-6867.7 C68.2@5225,-6867.7 ; C68.2@5217.5,-6867.7 L3.1@5282.5,-6867.7 ; C68.2@5225,-6867.7 5247.5,-6867.7 v1(5255,-6860.2) ; C68.2@5225,-6867.7 v1@5255,-6837.7 ; v1(5255,-6860.2) 5270,-6860.2 L3.1@5282.5,-6847.7 ; v1(5255,-6860.2) 5265,-6850.2 5265,-6810.2 ; v1(5255,-6860.2) v1@5255,-6837.7 ; v1@5255,-6837.7 v1(5255,-6835.2) ; v1@5255,-6837.7 v1(5255,-6835.2) ; v1(5255,-6835.2) v1@5255,-6815 ; v1@5255,-6815 v1(5255,-6810.2) v1@5259.8,-6810.2 ; v1@5255,-6815 v1@5259.8,-6810.2 ; v1@5259.8,-6810.2 5265,-6810.2 ; v1@5259.8,-6810.2 5282.5,-6787.5 L3.1@5282.5,-6822.7 ; 5265,-6810.2 5270,-6810.2 L3.1@5282.5,-6822.7 ; 5282.5,-6882.5 L3.1@5282.5,-6867.7 ; 5282.5,-6882.5 5317.5,-6882.5 ; L3.1@5282.5,-6867.7 L3.1@5282.5,-6847.7 ; L3.1@5282.5,-6847.7 L3.1@5295,-6835.2 ; L3.1@5282.5,-6822.7 L3.1@5295,-6835.2 ; L3.1@5295,-6835.2 5309.9,-6810.2 5295,-6810.2 5295,-6775 5332.5,-6775 5332.5,-6797.5 ; L3.1@5295,-6835.2 L3.1@5317.5,-6810.2 ; 5317.5,-6900 5317.5,-6882.5 ; 5317.5,-6900 5332.5,-6900 5332.5,-6797.5 ; 5317.5,-6882.5 L3.1@5317.5,-6810.2 ; L3.1@5317.5,-6810.2 5317.5,-6797.5 5332.5,-6797.5
  Bottom Layer w10: v1(5097.5,-6962.7) 5200,-6860.2 ; v1(5255,-6810.2) v1(5255,-6835.2) v1(5255,-6860.2) ; 5200,-6860.2 v1(5255,-6860.2) ; 5200,-6860.2 v1(5255,-6860.2)
N00179: TP19.1 U21.7 U22.1 | length 349.5
  Top Layer w7: U22.1@4765.1,-7152.6 4887.6,-7152.6 ; U21.7@5045.1,-7106.6 5043.6,-7105.1 5009.9,-7105.1 4962.4,-7152.6 4922.4,-7152.6 ; 4887.6,-7152.6 4922.4,-7152.6 ; 4887.6,-7152.6 TP19.1@4905,-7170 4922.4,-7152.6
N00180: R91.2 U12.9 | length 65.7
  Top Layer w12: U12.9@4228.7,-6996.9 4279.4,-6996.9 R91.2@4290,-7007.5
N00181: D6.2 R89.1 | length 994.3
  Top Layer w10: v1(4797.5,-6997.5) 4810,-6985 4844.9,-6985 4855,-6995.1 4875.1,-6995.1 R89.1@4887.5,-7007.5
  Mid-Layer 2 w10: D6.2@4307.5,-7403.5 4345,-7366 4345,-7285 4365,-7265 4795,-7265 4822.5,-7237.5 4822.5,-7150 4787.5,-7115 4787.5,-7007.5 v1(4797.5,-6997.5)
N00182: D5.2 R90.1 | length 736.7
  Top Layer w10: R90.1@4887.5,-7052.5 4887.5,-7062.5 4915,-7090 v1(4935,-7090)
  Bottom Layer w10: v1(4935,-7090) 4965,-7120 4965,-7370 4992.5,-7397.5 5255.5,-7397.5 D5.2@5307.5,-7345.5
N00183: R48.1 U12.6 | length 62.4
  Top Layer w12: R48.1@4127.5,-7092.5 4139.4,-7080.6 U12.6@4139.4,-7035
N00184: R48.2 TP21.1 U22.6 | length 676.5
  Top Layer w10: v1(4097.5,-7152.5) 4112.5,-7152.5 R48.2@4127.5,-7167.5 ; TP21.1@4337.5,-7112.5 4358,-7133 U22.6@4712.7,-7133
  Mid-Layer 2 w10: v1(4097.5,-7152.5) 4127.5,-7122.5 4327.5,-7122.5 TP21.1@4337.5,-7112.5
N00185: C73.1 R86.2 U21.17 | length 604.9
  Top Layer w7: U21.17@5146.5,-7021 5171.7,-7021 v1(5180,-7012.7)
  Top Layer w10: C73.1@5385,-6977.7 v1(5385,-6950.2)
  Top Layer w12: v1(5000,-7215) 5007.7,-7222.7 R86.2@5025,-7222.7
  Bottom Layer w10: v1(5180,-7012.7) 5185,-7007.7 5327.5,-7007.7 v1(5385,-6950.2)
  Bottom Layer w12: v1(5000,-7215) 5007.7,-7215 5180,-7042.7 v1(5180,-7012.7)
N00186: R47.1 U12.7 | length 62.7
  Top Layer w12: U12.7@4165,-7035 4165,-7080 R47.1@4177.5,-7092.5
N00187: R47.2 TP20.1 U22.7 | length 590.6
  Top Layer w10: R47.2@4177.5,-7167.5 4192.4,-7152.6 4320.1,-7152.6 ; U22.7@4712.7,-7152.6 4354.9,-7152.6 ; 4320.1,-7152.6 TP20.1@4337.5,-7170 4354.9,-7152.6 ; 4320.1,-7152.6 4354.9,-7152.6
N00188: R90.2 U21.3 | length 66.5
  Top Layer w7: R90.2@4962.5,-7052.5 4978.3,-7036.7 U21.3@5022.5,-7036.7
N00189: R87.1 U21.12 | length 66
  Top Layer w7: U21.12@5123.9,-7106.6 5123.9,-7121.6 5159.8,-7157.5 R87.1@5160,-7157.5
N00191: JP1.2 R126.1 U21.8 | length 1655.1
  Top Layer w7: v1(4790,-7180) 4817.5,-7207.5 4932.5,-7207.5 5009.8,-7130.2 5055,-7130.2 5060.9,-7124.3 U21.8@5060.9,-7106.6
  Top Layer w20: R126.1@3605,-7082.5 3682.5,-7005 JP1.2@3740,-7005 3825,-7005 v1(4035,-7215)
  Mid-Layer 2 w20: v1(4035,-7215) 4362.5,-7215 4400,-7177.5 4787.5,-7177.5 v1(4790,-7180)
N00192: C74.1 U21.10 | length 74.2
  Top Layer w7: U21.10@5092.4,-7106.6 5092.4,-7170.1 C74.1@5100,-7177.7
N00193: R98.2 U22.3 | length 66.1
  Top Layer w10: U22.3@4758.6,-7102.4 4758.6,-7048.9 R98.2@4767.5,-7040
N00194: D8.2 L22.2 U35.1 | length 1332.8
  Top Layer w25: 6020,-5697.5 6225,-5697.5 ; 6020,-5697.5 6020,-5754.9 L22.2@6097.5,-5734.5 ; 6020,-5697.5 6020,-5677.5 ; 6020,-5677.5 6225,-5677.5 ; 6020,-5677.5 6020,-5637.5 U35.1@6027.5,-5637.5 6225,-5637.5 6225,-5677.5 ; L22.2@6097.5,-5734.5 6097.5,-5735 6225,-5735 6225,-5754.9 D8.2@6222.5,-5754.9 6097.5,-5754.9 L22.2@6097.5,-5734.5 ; L22.2@6097.5,-5734.5 6097.5,-5717.5 6225,-5717.5 6225,-5697.5 ; 6225,-5697.5 6225,-5677.5
N00195: C127.2 R128.2 R129.1 U35.3 | length 610
  Top Layer w25: U35.3@6035,-5562.5 6050,-5562.5 ; U35.3@6035,-5562.5 6035,-5450 ; U35.3@6035,-5562.5 U35.3@6027.5,-5562.5 6020,-5562.5 6020,-5462.5 6020,-5450 6035,-5450 ; U35.3@6035,-5562.5 6067.5,-5562.5 ; 6035,-5450 R128.2@6050,-5450 ; 6050,-5562.5 6067.5,-5562.5 ; 6050,-5562.5 R129.1@6050,-5507.5 ; R129.1@6050,-5507.5 R128.2@6050,-5462.5 ; R129.1@6050,-5507.5 6055,-5507.5 R129.1@6067.5,-5507.5 ; R128.2@6050,-5462.5 R128.2@6050,-5450 ; R128.2@6050,-5462.5 R128.2@6065,-5462.5 ; R128.2@6050,-5450 6065,-5450 R128.2@6065,-5462.5 ; R128.2@6065,-5462.5 6067.5,-5462.5 R129.1@6067.5,-5507.5 ; 6067.5,-5562.5 R129.1@6067.5,-5507.5
N00197: R77.2 R78.1 U19.7 | length 121
  Top Layer w9: R78.1@5382.5,-1785 5382.5,-1747.5 5402.5,-1727.5 5437.5,-1727.5 5444,-1721 U19.7@5444,-1710
N00198: R82.2 R96.1 U19.11 | length 182.3
  Top Layer w9: U19.11@5514.8,-1710 5514.8,-1732.3 5560,-1777.5 R96.1@5560,-1785 ; R82.2@5562.5,-1825 5560,-1822.5 R96.1@5560,-1785 ; 5607.5,-1785 R96.1@5560,-1785
N00199: R76.1 R80.1 U19.2 | length 194
  Top Layer w9: U19.2@5514.8,-1596 5514.8,-1572.7 5522.5,-1565 5547.5,-1565 R76.1@5605,-1622.5 ; R80.1@5607.5,-1672.5 5607.5,-1625 R76.1@5605,-1622.5 ; R76.1@5607.5,-1622.5 R76.1@5605,-1622.5
N00200: R79.1 U19.8 | length 87.1
  Top Layer w9: R79.1@5432.5,-1785 5432.5,-1782.5 5461.7,-1753.3 U19.8@5461.7,-1710
N00201: U14.1 U14.4 U15.3 | length 355.5
  Top Layer w12: U15.3@5950,-3972.5 6002.5,-3972.5 6020,-3990 U14.4@6020,-4113 ; U14.4@6010.5,-4122.5 U14.4@6020,-4113 ; U14.1@6112.5,-4197.5 6080,-4197.5 6020,-4137.5 U14.4@6020,-4113
N00202: R52.2 R53.1 U14.3 | length 122.9
  Top Layer w12: U14.3@6112.5,-4122.5 6150,-4122.5 6175,-4097.5 R52.2@6225,-4097.5
N00203: S1.2 U19.5 | length 1735.7
  Top Layer w9: v1(5335,-1560) 5449.2,-1560 5461.7,-1572.5 U19.5@5461.7,-1596
  Mid-Layer 2 w12: S1.2@3910,-1805 4132.5,-1582.5 4550,-1582.5 4615,-1647.5 5247.5,-1647.5 v1(5335,-1560)
N00204: R59.2 U13.1 | length 61.6
  Top Layer w10: R59.2@5950,-3342.5 5960,-3352.5 U13.1@6007.5,-3352.5
N00205: C63.1 U19.4 | length 81.1
  Top Layer w9: C63.1@5455,-1525 5479.4,-1549.4 U19.4@5479.4,-1596
N00206: R63.2 U13.4 | length 62
  Top Layer w10: R63.2@5950,-3422.5 5960.9,-3411.6 U13.4@6007.5,-3411.6
N00207: R54.1 U15.2 U15.6 | length 321.7
  Top Layer w12: U15.2@5950,-3922.5 6047.5,-3922.5 6097.5,-3972.5 U15.6@6170,-3972.5 6247.5,-3972.5 R54.1@6250,-3975
N00208: C44.1 C50.1 R54.2 | length 494.2
  Top Layer w12: C44.1@6087.5,-4340 6212.5,-4340 6295,-4257.5 6295,-4050 R54.2@6250,-4050
N00209: C44.2 R55.1 | length 37.5
  Top Layer w12: R55.1@6012.5,-4377.5 C44.2@6012.5,-4340
N00210: R55.2 U16.3 | length 57.4
  Top Layer w12: R55.2@6012.5,-4452.5 6012.5,-4457.5 6030.4,-4475.4 U16.3@6030.4,-4502.5
N00211: C48.1 R49.2 R51.1 U15.1 | length 330.3
  Top Layer w12: U15.1@5950,-3872.5 6030,-3872.5 6057.5,-3845 R51.1@6057.5,-3752.5 ; C48.1@6025,-3690 6057.5,-3690 6057.5,-3732.5 R51.1@6050,-3740 ; R51.1@6050,-3740 6047.5,-3742.5 R51.1@6057.5,-3752.5 ; R51.1@6050,-3740 6057.5,-3747.5 R51.1@6057.5,-3752.5
N00212: R49.1 U13.7 | length 148.9
  Top Layer w10: R49.1@6057.5,-3615 6057.5,-3567.5 6065.2,-3559.8 U13.7@6065.2,-3469.3
N00213: C49.2 R50.2 R51.2 TP14.1 U15.5 | length 514
  Top Layer w12: v1(6105,-4022.5) U15.5@6170,-4022.5 ; v1(6105,-3940) 6102.5,-3937.5 6102.5,-3759.9 R51.2@6121.2,-3741.2 ; C49.2@6157.5,-3677.5 6122.5,-3677.5 6110,-3690 6110,-3730 R51.2@6121.2,-3741.2 ; TP14.1@6170,-3740 6167.5,-3742.5 6122.5,-3742.5 R51.2@6121.2,-3741.2
  Mid-Layer 2 w12: v1(6105,-4022.5) v1(6105,-3940)
N00214: J7.1 U16.5 | length 387.2
  Top Layer w12: U16.5@6010.7,-4622.3 6010.7,-4646.8 5917.5,-4740 5917.5,-4835 5980,-4897.5 J7.1@6027.5,-4897.5
N00215: J7.2 U16.8 | length 367
  Top Layer w12: U16.8@6069.7,-4622.3 6069.7,-4644.7 6165,-4740 6165,-4837.5 6105,-4897.5 J7.2@6077.5,-4897.5
N00216: C45.1 R56.1 | length 36
  Top Layer w12: R56.1@5852.5,-4340 5885,-4340 C45.1@5887.5,-4342.5
N00217: C45.2 R57.1 | length 35
  Top Layer w12: R57.1@5962.5,-4377.5 C45.2@5962.5,-4342.5
N00218: R57.2 U16.4 | length 71.8
  Top Layer w12: R57.2@5962.5,-4452.5 5962.5,-4457.5 6007.5,-4502.5 U16.4@6010.7,-4502.5
N00219: R50.1 U13.9 | length 150
  Top Layer w10: U13.9@6104.6,-3469.3 6104.6,-3552.1 6112.5,-3560 6112.5,-3612.5 R50.1@6110,-3615